# Altium PCB PCB1.PcbDoc (part 3 of 3)
Units mil, origin at the board's own origin, x right, y up, seen from the top; angles counter-clockwise.
Board outline 3150 x 1810 mil, 2 copper layers (Top Layer, Bottom Layer); 127 components, 76 nets, 410 pads, 265 vias.
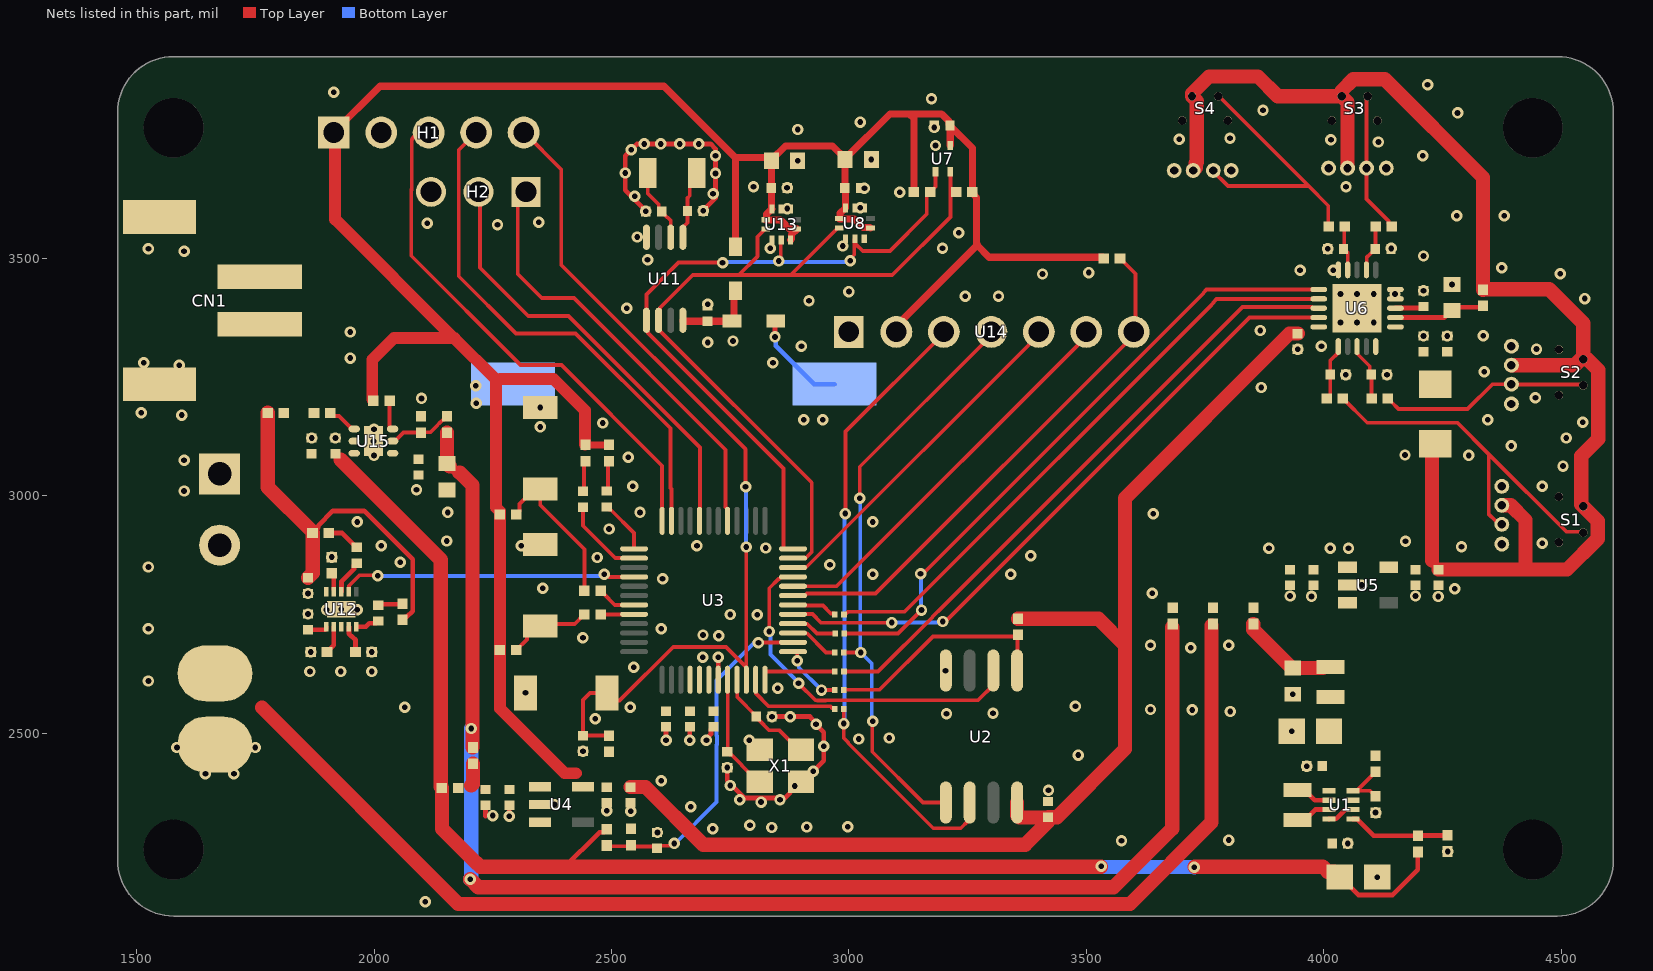
[diagram p2: the nets of this part, all layers, seen from the top]

## Via types
v1: diameter 24, hole 12, Top Layer to Bottom Layer, tented both sides, 265 vias

## Nets (pads, with @x,y where several pads share a name; then routed paths per layer and width w, separated by ;. In a path a pad name is that pad's centre, name@x,y a point inside that pad or via, vN(x,y) a via of type N, cw(c..) or ccw(c..) an arc to the next point about the centre after c; other vN are vias at no path point)
3V: C4.1 C5.1 C6.1 C7.1 C14.1 C15.1 C28.2 C30.1 C31.1 C32.1 C36.1 C37.1 D1.2 H1.1 R9.2 R12.1 R13.1 R20.2 R21.1 R23.2 R24.1 R32.2 R33.1 R40.1 U2.8 U3.4 U3.5 U3.6 U4.5 U6.15 U7.3 U8.1 U8.6 U8.10 U13.1 U13.5 U13.6 U13.10 U14.2 | length 7865.5
  Top Layer w15: H1.1@1915,3765 2012.37,3862.37 2610.96,3862.37 2761.32,3712.01 ; R40.1@1996.21,3202.71 R40.1@1998.76,3200.17 ; R23.2@2445,3107.04 R20.2@2495,3107.04 ; D1.2@2761.32,3524.32 2761.32,3712.01 ; U13.5@2877.15,3538.77 2877.48,3538.77 2879.13,3540.42 2879.13,3550.27 2890.23,3561.36 U13.6@2890.23,3561.7 2889.56,3562.37 2874.68,3562.37 2856.34,3580.71 2825.35,3580.71 U13.1@2824.69,3581.38 2826.34,3583.03 2826.34,3592.82 2837.44,3603.92 U13.10@2837.78,3603.92 2837.25,3604.44 2837.25,3647.91 C36.1@2836.73,3648.43 2836.85,3648.55 2836.85,3705.57 C37.1@2836.97,3705.69 ; C32.1@2992.12,3707.99 C32.1@2992.12,3709.95 ; U8.6@3045.38,3563.99 3044.71,3564.66 3029.83,3564.66 3011.49,3583 2980.5,3583 U8.1@2979.84,3583.67 2981.49,3585.32 2981.49,3595.11 2992.59,3606.21 U8.10@2992.93,3606.21 2992.93,3646.91 C31.1@2991.4,3648.43 2992.12,3649.15 C32.1@2992.12,3709.95 ; U14.2@3100,3345 3100,3358.26 3270.49,3528.75 ; R12.1@3136.96,3640 3136.96,3794.17 3127,3804.13 ; C30.1@3213.38,3779.63 3213.38,3737.93 U7.3@3213.75,3737.56 ; 3268.79,3530.45 3268.79,3628.08 3263.68,3633.2 3263.68,3636.87 3260.55,3640 R13.1@3260.04,3640 3260.04,3732.17 3213,3779.21 C30.1@3213,3780 3210.66,3782.34 3210.66,3788.83 3195.35,3804.13 3127,3804.13 ; 3269.72,3527.98 3295.32,3502.37 3534.54,3502.37 R33.1@3536.85,3500.06 ; 2761.32,3712.01 2830.65,3712.01 C37.1@2836.97,3705.69 ; C37.1@2836.97,3705.69 2836.97,3707.66 2866.21,3736.91 2965.16,3736.91 C32.1@2992.12,3709.95 ; C32.1@2992.12,3709.95 3086.29,3804.13 3127,3804.13
  Top Layer w25: H1.1@1915,3765 1918,3762 1918,3581.97 2167.79,3332.18 ; R40.1@1996.21,3202.71 1996.21,3286.7 2041.69,3332.18 2169.47,3332.18 ; 2169.25,3332.18 2255.97,3245.46 ; 2257.2,3245.51 2257.2,2975.2 2265,2967.4 R21.1@2265,2960.67 ; R21.1@2264.91,2960.58 2264.91,2681.83 2265,2681.73 R24.1@2265,2675 ; 2265.22,3245.88 2378.22,3245.88 2444.05,3180.05 R23.2@2444.05,3107.99 ; R24.1@2265.42,2674.58 2265.42,2551.57 2401.19,2415.8 2425.01,2415.8
  Top Layer w30: C15.1@2540,2386.54 2571.79,2386.54 2693.23,2265.11 3371.08,2265.11 3418.86,2312.89 C7.1@3418.86,2322.31 ; U2.8@3354.21,2354.08 3354.21,2327.38 3359.27,2322.32 C7.1@3418.87,2322.32 ; R32.2@3356,2741.04 3525.37,2741.04 3581.41,2685 ; C28.2@3945,3341.54 3927.91,3341.54 3581.41,2995.04 3581.41,2685 ; C7.1@3418.86,2322.31 C7.1@3419.65,2323.1 3437.93,2323.1 3581.41,2466.58 3581.41,2685
5.5V: C41.1 C42.1 R35.2 R38.2 R41.1 U15.1 | length 2966.1
  Top Layer w20: C41.1@2161.47,3061.98 2174.43,3049.03 2179.34,3049.03
  Top Layer w30: R35.2@2153.76,3133.13 C41.1@2153.76,3067.73 C41.1@2159.5,3061.98 ; 2179.34,3049.03 2180.5,3049.03 2207.48,3022.05 R41.1@2207.48,2470.72 ; v1(2202.89,2192.34) 2219.6,2175.63 3557.37,2175.63 3680.64,2298.9 R38.2@3680.64,2723.34
  Bottom Layer w30: v1(2202.89,2192.34) 2205,2194.44 v1(2205,2510)
5V: BEAD1.1 C20.1 C21.1 pad.6 R16.2 S1.1 S2.1 S3.1 S4.1 U5.5 | length 2984.8
  Top Layer w30: pad.6@3725,3685 3725,3685.4 3730.56,3690.96 3730.56,3700.19 3732.73,3702.36 3732.73,3831.05 S4.1@3722.44,3841.34 3722.44,3847.02 3758.56,3883.13 3861.17,3883.13 3902.97,3841.34 S3.1@4037.44,3841.34 ; pad.6@4050,3690 4050,3828.78 S3.1@4037.44,3841.34 ; 4228,2864 4228,3102.6 BEAD1.1@4235,3109.6 ; C21.1@4241.31,2844.53 4425,2844.53 ; R16.2@4335,3434.08 4335,3670.49 4128.45,3877.04 4062.16,3877.04 4037.44,3852.31 S3.1@4037.44,3841.34 ; R16.2@4335.92,3435 4474.56,3435 4546.34,3363.21 S2.1@4546.34,3287.56 ; pad.6@4380,2980 4393.89,2980 4425,2948.89 4425,2844.53 ; pad.6@4395.69,3275 4528.38,3275 4540.94,3287.56 S2.1@4546.34,3287.56 ; 4425,2844.53 4511.93,2844.53 4577.1,2909.7 4577.1,2946.8 S1.1@4546.34,2977.56 4542.25,2981.65 4542.25,3083.92 4578,3119.67 4578,3265.09 4555.53,3287.56 S2.1@4546.34,3287.56
5V_BOOST: C2.2 L1.1 R34.2 | length 209.1
  Top Layer w30: R34.2@3851.59,2730 3851.59,2718.4 3932.75,2637.24 C2.2@3934.72,2637.24 3997.94,2637.24 4000.21,2639.5 L1.1@4014.5,2639.5
5V_IN: C38.2 P1.2 pad.3@1665,2626 R39.2 U12.1 | length 2700.2
  Top Layer w10: C38.2@1861,2718.04 1897.41,2718.04 1899.5,2720.13 U12.1@1899.5,2724.48
  Top Layer w30: 1763.98,2554 2177.5,2140.49 3591.68,2140.49 3763.75,2312.55 R39.2@3763.75,2726.71
BAT_ADC: C35.2 R25.2 R28.1 U3.14 | length 725.9
  Top Layer w8: R28.1@2490.04,2263.67 2491.48,2262.22 2538.76,2262.22 R25.2@2541.06,2264.52 2544.05,2261.53 2592.61,2261.53 C35.2@2596.23,2257.92 ; C35.2@2595.27,2256.96 2601.38,2263.08 2622.75,2263.08 2627.67,2268 v1(2632,2268) ; v1@2801.85,2690.85 2855.68,2690.85 2855.74,2690.92 2881.82,2690.92 U3.14@2882.32,2691.42
  Bottom Layer w8: v1(2632,2268) 2634.28,2268 2721.37,2355.09 2721.37,2475.26 2722,2475.89 2722,2494.11 2721.37,2494.74 2721.37,2611.37 v1@2800,2690
  other v1: 2809.43,2690.29
BUTTON1: R19.2 U3.43 | length 83.3
  Top Layer w8: R19.2@2477.04,2800 2477.55,2800 2484.18,2793.37 2484.18,2792.86 2506.88,2770.16 U3.43@2547.68,2770.16
BUTTON2: R22.2 U3.44 | length 70.8
  Top Layer w8: R22.2@2477.04,2750 2477.28,2750.24 2547.45,2750.24 U3.44@2547.68,2750.47
CLK: R5.1 U2.6 U14.3 | length 1361.7
  Top Layer w8: R5.1@2989.02,2550.86 v1(2989.02,2520.3) 2989.02,2489.74 2998.48,2480.28 2998.48,2478.81 3177.51,2299.78 3235.67,2299.78 3250.99,2315.11 3250.99,2350.86 U2.6@3254.21,2354.08 ; v1@2993,2962 2993,3135.22 3200,3342.22 U14.3@3200,3345
  Bottom Layer w8: v1(2989.02,2520.3) 2990.64,2521.93 2990.64,2960.98 v1(2992.27,2962.61)
CNV: R10.1 U6.11 | length 1334.2
  Top Layer w8: R10.1@2990,2710 3103.42,2710 v1(3152.76,2759.34) ; v1@3158.49,2838.23 3742.4,3422.14 3750.67,3431.81 3750.89,3432.03 3753.24,3434.37 U6.11@3989.29,3434.37
  Bottom Layer w8: v1@3152.08,2831.92 3152.08,2760.02 v1(3152.76,2759.34)
  other v1: 3150.92,2835.9
DI: R8.1 U2.5 U14.4 | length 1245.3
  Top Layer w8: R8.1@2989.02,2670 v1(3025,2670) ; v1(3023,2995) 3023,3061.06 3300,3338.06 U14.4@3300,3345 ; v1(3050,2525) 3049.29,2524.29 3049.29,2461.11 3156.33,2354.08 U2.5@3204.21,2354.08
  Bottom Layer w8: v1(3023,2995) 3024,2994 3024,2671 v1(3025,2670) 3048.13,2646.87 3048.13,2526.87 v1(3050,2525)
DIN: R11.1 U6.12 | length 1276
  Top Layer w8: R11.1@2989.51,2750 2989.51,2750.41 2991.48,2752.38 2994.37,2752.38 2997.87,2755.88 3117.22,2755.88 3760.09,3398.74 3771.54,3412.13 3771.76,3412.35 3774.1,3414.69 U6.12@3989.29,3414.69
DO: U2.2 U3.21 | length 754.4
  Top Layer w8: v1(2832.35,2714.34) 2832.35,2805.43 2851.76,2824.84 2853.03,2824.84 2857.4,2829.21 U3.21@2882.32,2829.21 ; v1(2894,2605) 2929.65,2569.35 2932.78,2569.35 2933.19,2568.94 2951.42,2568.94 2951.84,2569.35 3271.82,2569.35 3304.21,2601.74 U2.2@3304.21,2632.04
  Bottom Layer w8: v1(2832.35,2714.34) 2834.58,2712.1 2834.58,2665.87 v1@2894.73,2605.73
GND: C1.2 C2.1 C3.2 C4.2 C5.2 C6.2 C7.2 C8.2 C9.1 C10.1 C11.1 C12.1 C13.2 C14.2 C15.2 C16.2 C17.2 C18.2 C19.2 C20.2 C21.2 C22.2 C23.2 C24.2 C25.2 C26.2 C27.2 C28.1 C29.2 C30.2 C31.2 C32.2 C33.2 C34.2 C35.1 C36.2 C37.2 C38.1 C39.1 C40.1 C41.2 C42.2 C43.1 C44.1 CN1.2 CN1.3 CN1.4 H1.2 H2.3 P1.1 pad.3@1665,2476 pad.4 pad.7 R2.2 R4.2 R25.1 R27.2 R30.1 R31.1 R36.1 S1.2 S1.3 S2.2 S2.3 S3.2 S3.3 S4.2 S4.3 SW1.1 SW2.1 SW3.1 U1.7 U2.4 U3.7 U4.2 U5.2 U6.4 U6.5 U6.10 U6.21 U7.4 U8.3 U8.5 U8.8 U8.9 U9.2 U11.4 U12.3 U12.11 U13.3 U13.8 U13.9 U14.1 U15.5 U15.7 X1.2 X1.4 | length 1197.4
  Top Layer w8: U4.2@2349.58,2350 v1(2380,2350) ; v1(2724.84,2659.84) v1@2725,2660
  Top Layer w10: 2235,2325 C13.2@2235,2348.46 ; v1(2285,2325) C16.2@2285,2348.46 ; v1@2490,2335 C14.2@2490,2353.46 ; v1@2540,2335 C15.2@2540,2353.46 ; v1(2572.46,3599) 2572.46,3599.79 2529,3643.25 2529,3716 v1(2541.5,3728.5) 2554,3741 v1(2569,3741) v1(2604,3741) v1(2644,3741) v1(2684,3741) 2709,3741 2719,3731 v1(2719,3716) v1(2719,3678.85) 2719,3626.71 2693.08,3600.79 v1(2693.08,3600) ; v1(2615,2485) C4.2@2615,2513.46 ; v1(2665,2485) C5.2@2665,2513.46 ; v1(2700,2485) 2700,2488.79 2709.37,2498.16 2709.37,2508.62 2714.21,2513.46 C6.2@2715,2513.46 ; U3.7@2724.84,2612.68 v1(2724.84,2659.84) ; v1(2743.78,2427.66) 2743.78,2399.78 2780.18,2363.38 2864.73,2363.38 2876.36,2375 2876.36,2379.38 2894.98,2398 X1.4@2898.92,2398 ; v1(2838.08,2535) 2918.04,2535 2930.9,2522.14 v1(2930.9,2518.64) 2947.26,2502.27 2947.26,2442.41 X1.4@2902.85,2398
  other v1: 2108.14,2145.15 4112.37,2197 4260.74,2250.96 4050.54,2268 3573.92,2273.84 3800,2275 2597,2291 2713,2299 2837.76,2301.57 2911.27,2302.51 2997.51,2303.08 2791.59,2306.28 2249.82,2326.61 4109,2332.92 2540.63,2335.41 2490.34,2336.69 2667,2345 2815,2355 2770,2360 2855,2360 3420.25,2379.8 2885.67,2388.69 2750,2390 2605,2400 1645,2415 1705,2415 2925.06,2420.2 3963.89,2430.71 3483,2454 2440,2461.92 1585,2470 1750,2470 2947.26,2472.34 2790,2485 3020.48,2487.92 3085,2490 3932.26,2504.15 2465.63,2530.29 2876.31,2535 3205.6,2540.79 3303.49,2541.81 3802.75,2545.8 3723.08,2549.05 3635,2550 2539.48,2554.48 2065,2555 3477,2557 3934.72,2582.12 2318.98,2585 2850,2595 1525,2610 1865,2630 1930,2630 1995,2630 3203.43,2631.56 2546.78,2639.02 2692.37,2659.81 1866.92,2671 1995.08,2671 3720,2680 3635,2685 3800,2685 2439.94,2701.19 2726.06,2705.6 2692.65,2706.82 1525,2720 2605,2720 2750,2750 2806.92,2749.61 1861,2751.12 1900,2760 1965,2760 1931,2761 3974.2,2788.13 4241,2788 3929,2789 4193,2789 1861,2794.36 3639,2795 4276,2804 2355,2805 4080,2812 2607.62,2825.39 3050,2835 3341,2835 1525,2850 2960,2855 2055,2860 2470,2870 1911,2871 3383,2874 3884.5,2889.28 2825,2890 4013.71,2889.72 4052.08,2889.72 4290,2893 2015,2895 2310,2895 2680,2895 4460,2900 4172,2904 2153.11,2904.83 2495,2930 1965,2945 3050,2945 3640.96,2962.31 2155,2965 2560,2965 1600,3010 2089.51,3012.45 2545,3020 4460,3020 4503.81,3062.57 1600,3075 2535.25,3080.91 2000,3085 4305,3085 4171,3086 4395,3105 1998.76,3115.17 1868.76,3121.71 1918.76,3121.71 4510.38,3121.76 2000,3140 2350,3145 2481.55,3153.31 4545,3155 2905,3160 2945,3160 4345,3160 1595,3170 1510,3175 2350,3186.02 2215,3195 2100,3205 4445.67,3206.21 3868,3228 2214.04,3231.75 4046.54,3255 4133.08,3255 4337.65,3261.11 1590,3275 1515,3280 2840,3280 1950,3290 3945,3308.46 4447.93,3309 2900,3315 3995,3315 2703,3323 2756,3326 4210,3336.54 4260,3336.54 4336,3337 1950,3345 3866,3348 4035,3365 4070,3365 4105,3365 2532,3395 2702.51,3403.45 2916,3411 4549.77,3415.3 3245,3420 3315,3420 4035,3425 4070,3425 4105,3425 4150,3425 3000,3430 4210,3431.54 4270,3445.12 3407.76,3467.13 4497.72,3467.35 3505,3470 3950,3475 4020,3475 4375,3480 2576,3497 4210,3505 1600,3515 1525,3520 4008.46,3520 2834.6,3521.23 3197,3521 4142.16,3520.86 2987,3526 2554,3545 3231,3554 2260,3571 2112,3574 2347,3576 4280,3590 4380,3590 2870,3604.85 3023.75,3606.66 2549,3631 2714,3636 3107,3639 2869.81,3648.43 3032.68,3647.88 2799,3651 4046.78,3651.08 2529,3679.62 2892.09,3705.69 3047.24,3707.99 4208.36,3715.76 3182.25,3737.56 4115,3745 4015,3750 3695.94,3750.88 3802.53,3752.71 2892.44,3771.41 3179.61,3775.53 3024,3787 4281.69,3806.26 3872,3812 3174,3836 1915,3850 4218.58,3865.5
IIC_SCL: R13.2 U3.23 U7.2 U8.2 U11.6 U13.2 | length 1756.1
  Top Layer w8: U13.2@2824.69,3561.7 2823.78,3561.7 2807.61,3545.53 2807.61,3504.22 2768.2,3464.81 ; 2877.65,3465.18 2974.68,3562.21 2974.68,3562.48 2976.2,3563.99 U8.2@2979.84,3563.99 ; U3.23@2882.32,2868.58 2882.82,2869.08 2909,2869.08 2921.85,2881.93 2921.85,3027.65 2599.2,3350.3 U11.6@2599.2,3369.59 2599.2,3390.66 2602.48,3393.94 2602.48,3396.03 2671.26,3464.81 2765.08,3464.81 2768.2,3464.81 ; U7.2@3213.75,3682.44 3213.75,3640 ; R13.2@3225.96,3640 3213.75,3640 ; 2768.2,3464.81 3091.36,3464.81 3213.75,3587.2 3213.75,3640
IIC_SDA: R12.2 U3.24 U7.1 U8.4 U11.5 U13.4 | length 1524.1
  Top Layer w8: v1(2734,3491) 2641,3491 2573.61,3423.61 2573.61,3348.53 2576.89,3345.25 2576.89,3342.73 2862.11,3057.52 2862.11,2889.48 2863.32,2888.27 U3.24@2882.32,2888.27 ; v1@2856.6,3494.93 2856.6,3537.91 U13.4@2857.46,3538.77 ; v1(3002.53,3495.05) 3002.53,3495.67 3000.78,3497.42 3011.09,3507.74 3011.09,3530.43 3011.09,3539.55 U8.4@3012.61,3541.06 ; 3014.12,3530.43 3029.08,3515.47 3086.27,3515.47 3163.91,3593.1 3163.91,3633.37 3170.53,3640 R12.2@3176.65,3640 ; R12.2@3171.04,3640 3171.55,3640 3174.1,3642.55 3182.25,3650.7 U7.1@3182.25,3682.44
  Bottom Layer w8: v1(2734,3491) 2735.11,3492.11 2850.35,3492.11 v1(2852.57,3494.32) 2854.73,3492.17 v1@3006.1,3492.17
IN0: C17.1 R14.2 U6.16 | length 119.8
  Top Layer w8: R14.2@4005.92,3205 4006.43,3205 4013.46,3212.04 C17.1@4013.46,3255 4013.46,3284.92 4030.63,3302.09 U6.16@4030.63,3314.29
IN1: C18.1 R15.2 U6.18 | length 122.1
  Top Layer w8: U6.18@4070,3314.29 4070.58,3313.71 4070.58,3299.25 4096.88,3272.94 4096.88,3258.12 4100.46,3254.54 4100.46,3205.46 R15.2@4100.92,3205
IN2: C26.1 R17.2 U6.7 | length 100.3
  Top Layer w8: U6.7@4089.68,3475.71 4090.26,3476.29 4090.26,3501.88 4099.21,3510.83 4100.07,3510.83 4108.46,3519.21 C26.1@4108.46,3520 4108.87,3520.41 4108.87,3566.98 R17.2@4109.27,3567.39
IN3: C29.1 R18.2 U6.9 | length 97.5
  Top Layer w8: R18.2@4044.27,3567.39 4042.9,3566.03 4042.9,3521.36 C29.1@4041.54,3520 4041.54,3519.21 4047.38,3513.37 4049.19,3513.37 4050.31,3512.25 U6.9@4050.31,3475.71
ISET2: U3.40 U12.7 | length 627.8
  Top Layer w8: U12.7@1946.75,2797.52 1947.16,2797.93 1947.16,2810.67 1969.18,2832.69 v1@2008.47,2832.69 ; v1(2485,2835) 2489.33,2835 2495.12,2829.21 U3.40@2547.68,2829.21
  Bottom Layer w8: v1(2008.04,2831.93) 2008.92,2831.04 2476.71,2831.04 2480.67,2835 v1(2485,2835)
LED1: LED1.1 U3.37 | length 113.7
  Top Layer w8: LED1.1@2490,2976.53 2495.84,2970.69 2498.49,2970.69 2547.68,2921.5 U3.37@2547.68,2888.27
LED2: LED2.1 U3.38 | length 175.1
  Top Layer w8: LED2.1@2439.96,2976.03 2439.96,2937.06 2507.94,2869.08 2547.18,2869.08 U3.38@2547.68,2868.58
NetBEAD1_2: BEAD1.2 C23.1 C24.1 U6.1 U6.20
NetC1_1: C1.1 C3.1 L1.2 R1.1 U1.1
NetC8_1: C8.1 U3.8 X1.3 | length 247.4
  Top Layer w8: U3.8@2744.53,2612.68 2744.76,2612.45 2744.76,2464.64 2744.76,2461.73 C8.1@2743.78,2460.74 2749.62,2454.9 2752.18,2454.9 2774.25,2432.83 2774.25,2432.1 2808.36,2398 X1.3@2812.3,2398
NetC11_2: C11.2 U3.9 X1.1 | length 218.4
  Top Layer w8: U3.9@2764.21,2612.68 2764.71,2612.18 2764.71,2576.07 2805,2535.79 C11.2@2805,2535 2810.84,2529.16 2810.84,2527.62 2832.38,2506.09 2853.82,2506.09 2894.98,2464.93 X1.1@2898.92,2464.93
NetC13_1: C13.1 C16.1 R41.2 R42.2 U4.1 U4.3 | length 51.4
  Top Layer w15: C13.1@2231.87,2379.2 2232.66,2379.2 C13.1@2235,2381.54
  Top Layer w30: 2205,2390 2208.19,2393.19 R41.2@2208.19,2435.93
NetC19_1: C19.1 C22.1 R34.1 R38.1 R39.1 U5.1 U5.3
NetC33_1: C33.1 U10.2 U11.1 | length 147.6
  Top Layer w8: U11.1@2650.39,3544.41 2650.39,3565.48 2660,3575.09 C33.1@2660,3600 2660,3627.17 2664.8,3631.97 2664.8,3665.3 U10.2@2679.5,3680
NetC34_1: C34.1 D1.1 D2.1 U11.8 | length 172.8
  Top Layer w8: D2.1@2753.3,3367.46 D2.1@2757.84,3372 ; D1.1@2757.84,3428.52 D1.1@2761.32,3432
  Top Layer w15: U11.8@2650.39,3369.59 2650.39,3367.68 2650.61,3367.46 C34.1@2702,3367.46 D2.1@2753.3,3367.46 ; D2.1@2757.84,3372 D1.1@2757.84,3428.52
NetC39_2: C39.2 R26.2 R29.2 R37.1 U12.10 | length 803.6
  Top Layer w10: R29.2@1870.43,2921.58 1870.93,2921.58 1882.37,2933.02 1882.37,2936.77 1913.6,2968 1979.53,2968 2081.63,2865.9 2081.63,2757.31 2069.38,2745.05 2065.63,2745.05 2060,2739.43 R26.2@2060,2738.92
  Top Layer w30: R37.1@1776.28,3174.64 1776.28,3018.18 1869.92,2924.54 1869.92,2923.35 1870.96,2922.31 1870.96,2837.4 C39.2@1861,2827.44
NetC40_2: C40.2 U10.1 U11.2 | length 156.1
  Top Layer w8: U10.1@2576.5,3680 2576.5,3636.5 2599.7,3613.31 2599.7,3604.84 C40.2@2605.54,3599 2605.54,3598.21 2618.35,3585.41 2619.13,3585.41 2624.79,3579.75 U11.2@2624.79,3544.41
NetD2_2: D2.2 U9.1 | length 211.2
  Top Layer w10: v1(2844.33,3334.53) 2844.33,3366.17 D2.2@2846.16,3368
  Bottom Layer w10: v1(2844.33,3334.53) 2846.16,3332.7 2846.16,3315.53 2926.69,3235 U9.1@2970,3235
NetL2_1: L2.1 U1.3 | length 75.2
  Top Layer w10: L2.1@3945,2317 3959.76,2317 3982.08,2339.32 U1.3@4011,2339.32
NetL2_2: L2.2 U1.2 | length 74.7
  Top Layer w10: L2.2@3945,2380 3959.76,2380 3980.76,2359 U1.2@4011,2359
NetLED1_2: LED1.2 R20.1 | length 65
  Top Layer w8: LED1.2@2490,3010 2492.5,3012.5 2492.5,3070.46 R20.1@2495,3072.96
NetLED2_2: LED2.2 R23.1 | length 65.6
  Top Layer w8: LED2.2@2439.96,3009.49 2442.48,3012.02 2442.48,3070.44 R23.1@2445,3072.96
NetLED3_1: LED3.1 U12.5 | length 51.4
  Top Layer w10: U12.5@1962.5,2724.48 1983.09,2724.48 1990.04,2731.43 2004.16,2731.43 LED3.1@2009,2736.27
NetLED3_2: LED3.2 R26.1 | length 52.4
  Top Layer w10: LED3.2@2009,2769.73 2010.63,2771.36 2058.36,2771.36 R26.1@2060,2773
NetLED4_1: LED4.1 U12.8 | length 74.4
  Top Layer w10: U12.8@1931,2797.52 1931.34,2797.86 1931.34,2819.41 1957.92,2845.99 1957.92,2853.16 1962.76,2858 LED4.1@1963.55,2858
NetLED4_2: LED4.2 R29.1 | length 71.5
  Top Layer w10: R29.1@1904.51,2921.58 1932.65,2921.58 1962.76,2891.47 LED4.2@1963.55,2891.47
NetR1_2: R1.2 R2.1 U1.8 | length 117.3
  Top Layer w8: U1.8@4070.79,2380.2 4069.27,2378.69 U1.8@4061.4,2378.69 4097.81,2378.69 4109,2367.51 R2.1@4109,2367 ; U1.8@4070.79,2380.24 4109,2418.45 R1.2@4109,2418.96
NetR3_2: R3.2 R4.1 U1.5 | length 214.5
  Top Layer w10: U1.5@4061.4,2319.63 4069.27,2319.63 4104.86,2284.04 R3.2@4198,2284.04 4198.5,2284.54 4260.24,2284.54 R4.1@4260.74,2285.04
NetR5_2: R5.2 U3.11 | length 209.1
  Top Layer w8: U3.11@2803.58,2612.68 2804.08,2612.18 2804.08,2583.38 2830.46,2557 2897.37,2557 2897.43,2556.94 2960.99,2556.94 2964.68,2553.24 2968.03,2553.24 2970,2551.27 R5.2@2970,2550.86
NetR6_2: R6.2 U3.12 | length 163.8
  Top Layer w8: U3.12@2823.27,2612.68 2823.27,2628.79 2824.48,2630 R6.2@2970.49,2630
NetR7_2: R7.2 U3.13 | length 137.6
  Top Layer w8: U3.13@2882.32,2671.73 2889.92,2671.73 2891.13,2670.52 v1(2891.13,2652.51) ; v1(2942.31,2590.94) R7.2@2969.79,2590.94
  Bottom Layer w8: v1(2891.13,2652.51) 2894.19,2649.45 2894.19,2639.05 v1(2942.31,2590.94)
NetR8_2: R8.2 U3.15 | length 104.7
  Top Layer w8: U3.15@2882.32,2711.1 2882.82,2710.6 2911.44,2710.6 2952.03,2670 R8.2@2970,2670
NetR10_2: R10.2 U3.16 | length 97.3
  Top Layer w8: U3.16@2882.32,2730.79 2882.82,2730.29 2912.32,2730.29 2932.61,2710 R10.2@2970.98,2710
NetR11_2: R11.2 U3.18 | length 96.8
  Top Layer w8: U3.18@2882.32,2770.16 2882.82,2769.66 2908.9,2769.66 2909.7,2768.85 2945.18,2768.85 2961.65,2752.38 2968.52,2752.38 2970.49,2750.41 R11.2@2970.49,2750
NetR14_1: pad.5@4374.81,2940 R14.1 S1.4 | length 786.6
  Top Layer w8: R14.1@4040,3205 4040.51,3205 4091.6,3153.9 4281.48,3153.9 4347.16,3088.22 ; pad.5@4374.81,2940 4370.05,2940 4363.52,2946.53 4362.27,2946.53 4347.16,2961.64 4347.16,3088.22 ; S1.4@4546.34,2922.44 4544.54,2924.24 4511.14,2924.24 4347.16,3088.22
NetR15_1: pad.5@4395,3235 R15.1 S2.4 | length 443.2
  Top Layer w8: R15.1@4135,3205 4135.51,3205 4142.14,3198.37 4142.14,3197.86 4157.49,3182.51 4302.8,3182.51 4355.06,3234.76 pad.5@4405,3234.76 ; pad.5@4405.35,3234.65 4541.5,3234.65 4543.71,3232.44 S2.4@4546.34,3232.44
NetR17_1: pad.5@4090,3690 R17.1 S3.4 | length 297.5
  Top Layer w8: S3.4@4092.56,3841.34 4089.9,3838.68 4089.9,3625.14 4136.22,3578.82 4136.22,3574.02 4142.85,3567.39 R17.1@4143.35,3567.39
NetR18_1: pad.5@3767.3,3684.97 R18.1 S4.4 | length 587.7
  Top Layer w8: pad.5@3765,3685 3797.94,3652.06 3968.37,3652.06 ; S4.4@3777.56,3841.34 3779.09,3841.34 3968.37,3652.06 ; R18.1@4009.49,3567.58 4009.49,3610.93 3968.37,3652.06
NetR19_1: R19.1 R21.2 SW2.2 | length 334.4
  Top Layer w8: R21.2@2299.08,2960.67 2299.59,2960.67 2306.22,2967.3 2306.22,2982.6 2337.6,3013.98 SW2.2@2350,3013.98 2350,2980.53 2442.96,2887.57 R19.1@2442.96,2800
NetR22_1: R22.1 R24.2 SW3.2 | length 179.5
  Top Layer w8: R24.2@2299.08,2675 2299.59,2675 2321.89,2697.31 2321.89,2705.11 2342.11,2725.32 SW3.2@2350,2725.32 2354.89,2730.21 2422.67,2730.21 2442.45,2750 R22.1@2442.96,2750
NetR27_1: R27.1 U12.9 | length 36.3
  Top Layer w10: R27.1@1911,2836.92 1915.41,2832.51 U12.9@1915.41,2802.46
NetR30_2: R30.2 U12.2 | length 59.7
  Top Layer w10: R30.2@1901,2671 1901.51,2671 1907.13,2676.63 1907.13,2677.14 1915.25,2685.25 U12.2@1915.25,2724.48
NetR31_2: R31.2 U12.4 | length 59.7
  Top Layer w10: U12.4@1946.75,2724.48 1947.09,2724.14 1947.09,2709.98 1953.53,2703.54 1954.09,2703.54 1961,2696.63 R31.2@1961,2671
NetR35_1: R35.1 R36.2 U15.2 | length 136.3
  Top Layer w8: U15.2@2039.25,3115.17 2044.03,3115.17 2061.99,3133.13 R36.2@2098.76,3133.13 ; R36.2@2098.77,3133.65 2118.67,3133.65 2133.13,3148.1 2133.13,3148.41 2138.98,3154.27 2139.29,3154.27 2145.1,3160.08 2147.13,3160.08 2153.76,3166.71 R35.1@2153.76,3167.21
NetR40_2: R40.2 U15.3 | length 63.9
  Top Layer w8: R40.2@2032.84,3200.17 2032.84,3144.1 2036.18,3140.76 U15.3@2039.25,3140.76
NetR43_2: R43.2 U15.4 | length 64.5
  Top Layer w8: R43.2@1907.76,3174.64 1914.39,3168.01 1926.23,3168.01 1953.48,3140.76 U15.4@1958.27,3140.76
NRST: C12.2 H1.5 R9.1 SW1.2 U3.10 | length 1899.3
  Top Layer w8: H1.5@2315,3765 2316.85,3765 2394.42,3687.43 2394.42,3486.22 2782.43,3098.22 v1(2782.43,3018.74) ; R9.1@2495,2495 C12.2@2440,2495 2440,2570.19 2454.81,2585 SW1.2@2491.02,2585 2507.04,2568.98 2517.16,2568.98 2630.02,2681.84 2740.92,2681.84 U3.10@2783.4,2639.36 ; v1@2783,2893 v1(2783.73,2892.27) 2783.73,2639.36 2783.74,2612.84 U3.10@2783.9,2612.68
  Bottom Layer w8: v1(2782.43,3018.74) 2783.08,3018.09 2783.08,2892.92 v1(2783.73,2892.27)
OLED_CS: R33.2 U3.19 U14.7 | length 1125.3
  Top Layer w8: U3.19@2882.32,2789.84 2907.24,2789.84 2911.62,2794.22 3056.04,2794.22 3600,3338.17 U14.7@3600,3348.73 ; R33.2@3570.93,3500.06 3603.47,3467.52 3603.47,3348.47 U14.7@3600,3345
OLED_DC: U3.20 U14.6 | length 845.1
  Top Layer w8: U3.20@2882.32,2809.53 2974.12,2809.53 3500,3335.41 U14.6@3500,3345
OLED_RES: U3.22 U14.5 | length 726.6
  Top Layer w8: U3.22@2882.32,2848.9 2882.82,2849.4 2910.18,2849.4 3400,3339.23 U14.5@3400,3345
REF: C25.1 R16.1 U6.2 | length 194.5
  Top Layer w10: U6.2@4150.71,3375.32 4253.35,3375.32 4268.03,3390 C25.1@4270,3390 4277.14,3397.14 4332.14,3397.14 R16.1@4335,3400
REFIN: C27.1 U6.3 | length 60.7
  Top Layer w10: U6.3@4150.71,3395 4150.91,3395.2 4206.74,3395.2 C27.1@4210,3398.46
SCK: R6.1 U6.13 | length 1319
  Top Layer w8: R6.1@2989.51,2630 3061.47,2630 3175.4,2743.93 3175.4,2744.42 3188.29,2757.31 3188.78,2757.31 3828.95,3397.47 3973.79,3397.47 3976.27,3395 U6.13@3989.29,3395
SDO: U3.17 U6.14 | length 1370.4
  Top Layer w8: U3.17@2882.64,2750.79 2923.41,2750.79 2941.72,2732.48 3089.48,2732.48 v1(3090,2733) ; v1@3206.32,2738.21 3843.43,3375.32 U6.14@3989.29,3375.32
  Bottom Layer w8: v1@3089.88,2733.17 3195.27,2733.17 v1(3197.4,2735.31)
SWCLK: H1.3 U3.36 | length 1109.2
  Top Layer w8: H1.3@2083.59,3756.31 2079.52,3749.95 2079.52,3649.15 ccw(c2120,3640) 2078.5,3639.73 2078.5,3505.41 2308.6,3275.32 2394.54,3275.32 2606.73,3063.13 U3.36@2606.73,2947.32 ; H1.3@2085.86,3758.58 H1.3@2115,3765
SWDIO: H1.4 U3.35 | length 1091.8
  Top Layer w8: H1.4@2215,3765 2178.5,3728.5 2178.5,3462.24 2298.77,3341.97 2424.21,3341.97 2624.1,3142.09 2624.1,3016.65 2626.42,3014.32 U3.35@2626.42,2947.32
USART1_RX: H2.2 U3.32 | length 935.8
  Top Layer w8: H2.2@2220,3640 2223.35,3636.65 2223.35,3480.1 2324.76,3378.69 2409.41,3378.69 2686.34,3101.76 2686.34,2974.26 2685.97,2973.9 2685.97,2947.82 U3.32@2685.47,2947.32
USART1_TX: H2.1 U3.29 | length 922.4
  Top Layer w8: H2.1@2320,3640 2302.74,3622.74 2302.74,3466.82 2353.19,3416.37 2420.81,3416.37 2740.26,3096.93 2740.26,2976.52 2744.53,2972.24 U3.29@2744.53,2947.32
VBAT: C9.2 C10.2 C43.2 C44.2 CN1.1 R3.1 R28.2 R37.2 R42.1 R43.1 U1.4 U1.6 U15.6 | length 3220.7
  Top Layer w10: 2397.59,2214.18 2475.03,2291.61 2484.41,2291.61 2490.04,2297.24 R28.2@2490.04,2297.75 ; U1.4@4011,2319.63 4011.51,2320.14 4026.28,2320.14 4044.94,2338.81 4060.89,2338.81 U1.6@4061.4,2339.32 ; C10.2@4033.63,2197 4034.81,2197 4072.39,2159.43 4144.68,2159.43 4198,2212.74 R3.1@4198,2249.96
  Top Layer w30: 1930,3076 2140.72,2865.28 2140.72,2387.24 R42.1@2142.96,2385 2142.96,2299.01 2215.63,2226.34 2216.98,2226.34 2224.25,2219.07 2397.59,2219.07 2640.4,2219.07 2640.45,2219.02 v1@3530.62,2219.02 ; v1@3728.1,2218.91 3997.57,2218.91 4007.91,2208.57 4022.05,2208.57 C10.2@4033.63,2197
  Bottom Layer w30: v1@3532.42,2218.38 3726.76,2218.38 v1(3727.16,2217.98)
  other v1: 3531.2,2219.6
W25Q128_CS#: R7.1 R32.1 U2.1 | length 490.2
  Top Layer w8: R7.1@2989.35,2591.48 3064.72,2591.48 3177.21,2703.97 3353.01,2703.97 R32.1@3356,2706.96 3355.1,2706.06 3355.1,2632.93 U2.1@3354.21,2632.04
pads on no net: *1.1 *2.1 *3.1 *4.1 U2.3 U2.7 U3.1 U3.2 U3.3 U3.25 U3.26 U3.27 U3.28 U3.30 U3.31 U3.33 U3.34 U3.39 U3.41 U3.42 U3.45 U3.46 U3.47 U3.48 U4.4 U5.4 U6.6 U6.8 U6.17 U6.19 U8.7 U11.3 U11.7 U12.6 U13.7
copper on no net: | length 6031.9
  Top Layer w6: 1698,2255 ccw(c1578,2255) 1698,2255 ; 1698,3775 ccw(c1578,3775) 1698,3775 ; 4560,2255 ccw(c4440,2255) 4560,2255 ; 4560,3775 ccw(c4440,3775) 4560,3775
  Bottom Layer w6: 1698,2255 ccw(c1578,2255) 1698,2255 ; 1698,3775 ccw(c1578,3775) 1698,3775 ; 4560,2255 ccw(c4440,2255) 4560,2255 ; 4560,3775 ccw(c4440,3775) 4560,3775

## Polygon pours and split planes (outlines as drawn)
GND on Top Layer "NONET_L-01_P-001" (solid, remove dead copper, pour order 32): 1460,2233.11 1460,3806.89 cw(c1578.11,3806.89) 1578.11,3925 4491.89,3925 cw(c4491.89,3806.89) 4610,3806.89 4610,2233.11 cw(c4491.89,2233.11) 4491.89,2115 1578.11,2115 cw(c1578.11,2233.11)
NetC19_1 on Top Layer "NONET_L-01_P-001" (hatched Horizontal grid 4 track 5, remove dead copper, pour order 31): 3660,2745 3875,2745 3875,2790 3910,2825 3995,2825 3995,2790 4035,2750 4040,2755 4080,2755 4080,2785 4075,2790 4030,2790 4030,2830 4080,2830 4080,2860 4070,2870 3755,2870 3660,2775
NetC13_1 on Top Layer "NONET_L-01_P-001" (hatched Horizontal grid 4 track 5, remove dead copper, pour order 29): 2170,2405 2380,2405 2380,2375 2370,2365 2325,2365 2325,2335 2375,2335 2390,2320 2390,2285 2315,2285 2305,2295 2305,2365 2170,2365
VBAT on Top Layer "NONET_L-01_P-001" (hatched Horizontal grid 4 track 5, remove dead copper, pour order 28): 1655,3400 1660,3395 1660,3270 1725,3270 1795,3200 1795,3120 1860,3055 1970,3055 1970,3100 1965,3105 1850,3105 1850,3145 1855,3140 1890,3140 1890,3400
5.5V on Top Layer "NONET_L-01_P-001" (hatched Horizontal grid 4 track 5, remove dead copper, pour order 27): 2025,3100 2180,3100 2180,3040 2175,3035 2125,3035 2125,3040 2105,3060 2025,3060
NetC39_2 on Top Layer "NONET_L-01_P-001" (hatched Horizontal grid 4 track 5, remove dead copper, pour order 26): 1845,2840 1845,2810 1875,2810 1890,2795 1890,2785 1910,2785 1907.53,2787.47 1907.53,2813.91 1897.74,2813.91 1890,2821.65 1890,2845 1850,2845
NetC1_1 on Top Layer "NONET_L-01_P-001" (hatched Horizontal grid 4 track 5, remove dead copper, pour order 23): 3985,2608 3985,2582 3985,2465 3985,2387 3985,2370 4024,2370 4091,2437 4137,2437 4137,2541 4070,2608
VBAT on Top Layer "NONET_L-01_P-001" (hatched Horizontal grid 4 track 5, remove dead copper, pour order 22): 3991,2329 4030,2329 4030,2261 4073,2218 4074,2218 4074,2152 3982,2152 3982,2320
5V on Top Layer "NONET_L-01_P-001" (hatched Horizontal grid 4 track 5, remove dead copper, pour order 18): 4103,2872 4103,2840 4118,2825 4272,2825 4272,2871 4264,2879 4262,2877 4124,2877
3V on Top Layer "NONET_L-01_P-001" (hatched Horizontal grid 4 track 5, remove dead copper, pour order 16): 3909,3366 3910,3365 4012,3365 4012,3350 3995,3333 3908.21,3333
5V_IN on Top Layer "NONET_L-01_P-001" (hatched Horizontal grid 4 track 5, remove dead copper, pour order 10): 1905,2740 1840,2740 1835,2735 1830,2740 1830,2810 1680,2960 1625,2960 1575,2910 1575,2580 1605,2550 1845,2550 1845,2673.06 1905,2716.39
NetBEAD1_2 on Top Layer "NONET_L-01_P-001" (hatched Horizontal grid 4 track 5, remove dead copper, pour order 5): 4100,3340 4100,3285 4155,3285 4195,3245 4195,3200 4295,3200 4295,3315 4190,3315 4180,3325 4180,3365 4130,3365 4125,3370 4125,3340
3V on Top Layer "NONET_L-01_P-001" (hatched Horizontal grid 4 track 5, remove dead copper, pour order 0): 2415,2370 2570,2370 2570,2505 2595,2530 2720,2530 2720,2645 2655,2645 2655,2570 2570,2570 2570,2545 2500,2475 2465,2475 2465,2450 2440,2425 2415,2425
GND on Bottom Layer "NONET_L-01_P-001" (solid, remove dead copper, pour order 33): 1460,2233.11 1460,3806.89 cw(c1578.11,3806.89) 1578.11,3925 4491.89,3925 cw(c4491.89,3806.89) 4610,3806.89 4610,2233.11 cw(c4491.89,2233.11) 4491.89,2115 1578.11,2115 cw(c1578.11,2233.11)

## Other copper
Top Layer:
  pour cut-out: 2720,2485 2720,2400 2775,2350 2780,2350 2940,2350 2965,2375 2960,2380 2960,2515 2919.07,2555.93 2784.86,2555.93
  pour cut-out: 2564,3596 2519,3641 2519,3721 2514,3726 2544,3756 2704,3756 2724,3736 2729,3736 2729,3621 2694,3586 2694,3581 2574,3581 2569,3586

## Silkscreen, mask and mechanical layers (free items; w line width, h text height)
Top Overlay:
  lines w10: 3101.24,3230.07 3129.37,3201.94 3130.26,3201.94 ; 3130.26,3268.94 3130.26,3201.94 ; 3160,3230 3131.94,3201.94 3130.26,3201.94
  text "3V" at 1878,3834 h30
  text "GND" at 1960.51,3834 h30
  text "CLK" at 2073,3834 h30
  text "DIO" at 2185.5,3834 h30
  text "RST" at 2293,3834 h30
  text "- + S -" at 3973.01,3638.43 h30
  text "- + S -" at 3640,3620 h30
  text "GND" at 2076,3525 h30
  text "RX" at 2200.47,3525 h30
  text "TX" at 2285,3525 h30
  text "GND" at 1879,3439 h30
  text "GND" at 2950.92,3404.02 h30
  text "3V" at 3073.66,3404.02 h30
  text "CLK" at 3166.42,3404.02 h30
  text "DI" at 3289.16,3404.02 h30
  text "RES" at 3371.92,3404.02 h30
  text "DC" at 3494.67,3404.02 h30
  text "CS" at 3587.42,3404.02 h30
  text "- + S -" at 4340,3350 h30 r270
  text "VBAT" at 1880,3333 h30
  text "OLED" at 2950.42,3245.62 h30
  text "GND" at 1629.27,3154.67 h30
  text "- + S -" at 4315,3065 h30 r270
  text "5V" at 1646.64,2744.88 h30
  text "RST" at 2203.17,2575.49 h30
  text "W4-ADC / Ver1.2 / 2026/10/26" at 4268,2545 h30
  text "GND" at 1630,2365 h30
Mechanical 1:
  the board outline again, w10